# Altium PCB PCB1.PcbDoc
Units mm, origin at the board's own origin, x right, y up, seen from the top; angles counter-clockwise.
Board outline 40 x 45.42 mm, 2 copper layers (Top Layer, Bottom Layer); 17 components, 15 nets, 79 pads, 9 vias.
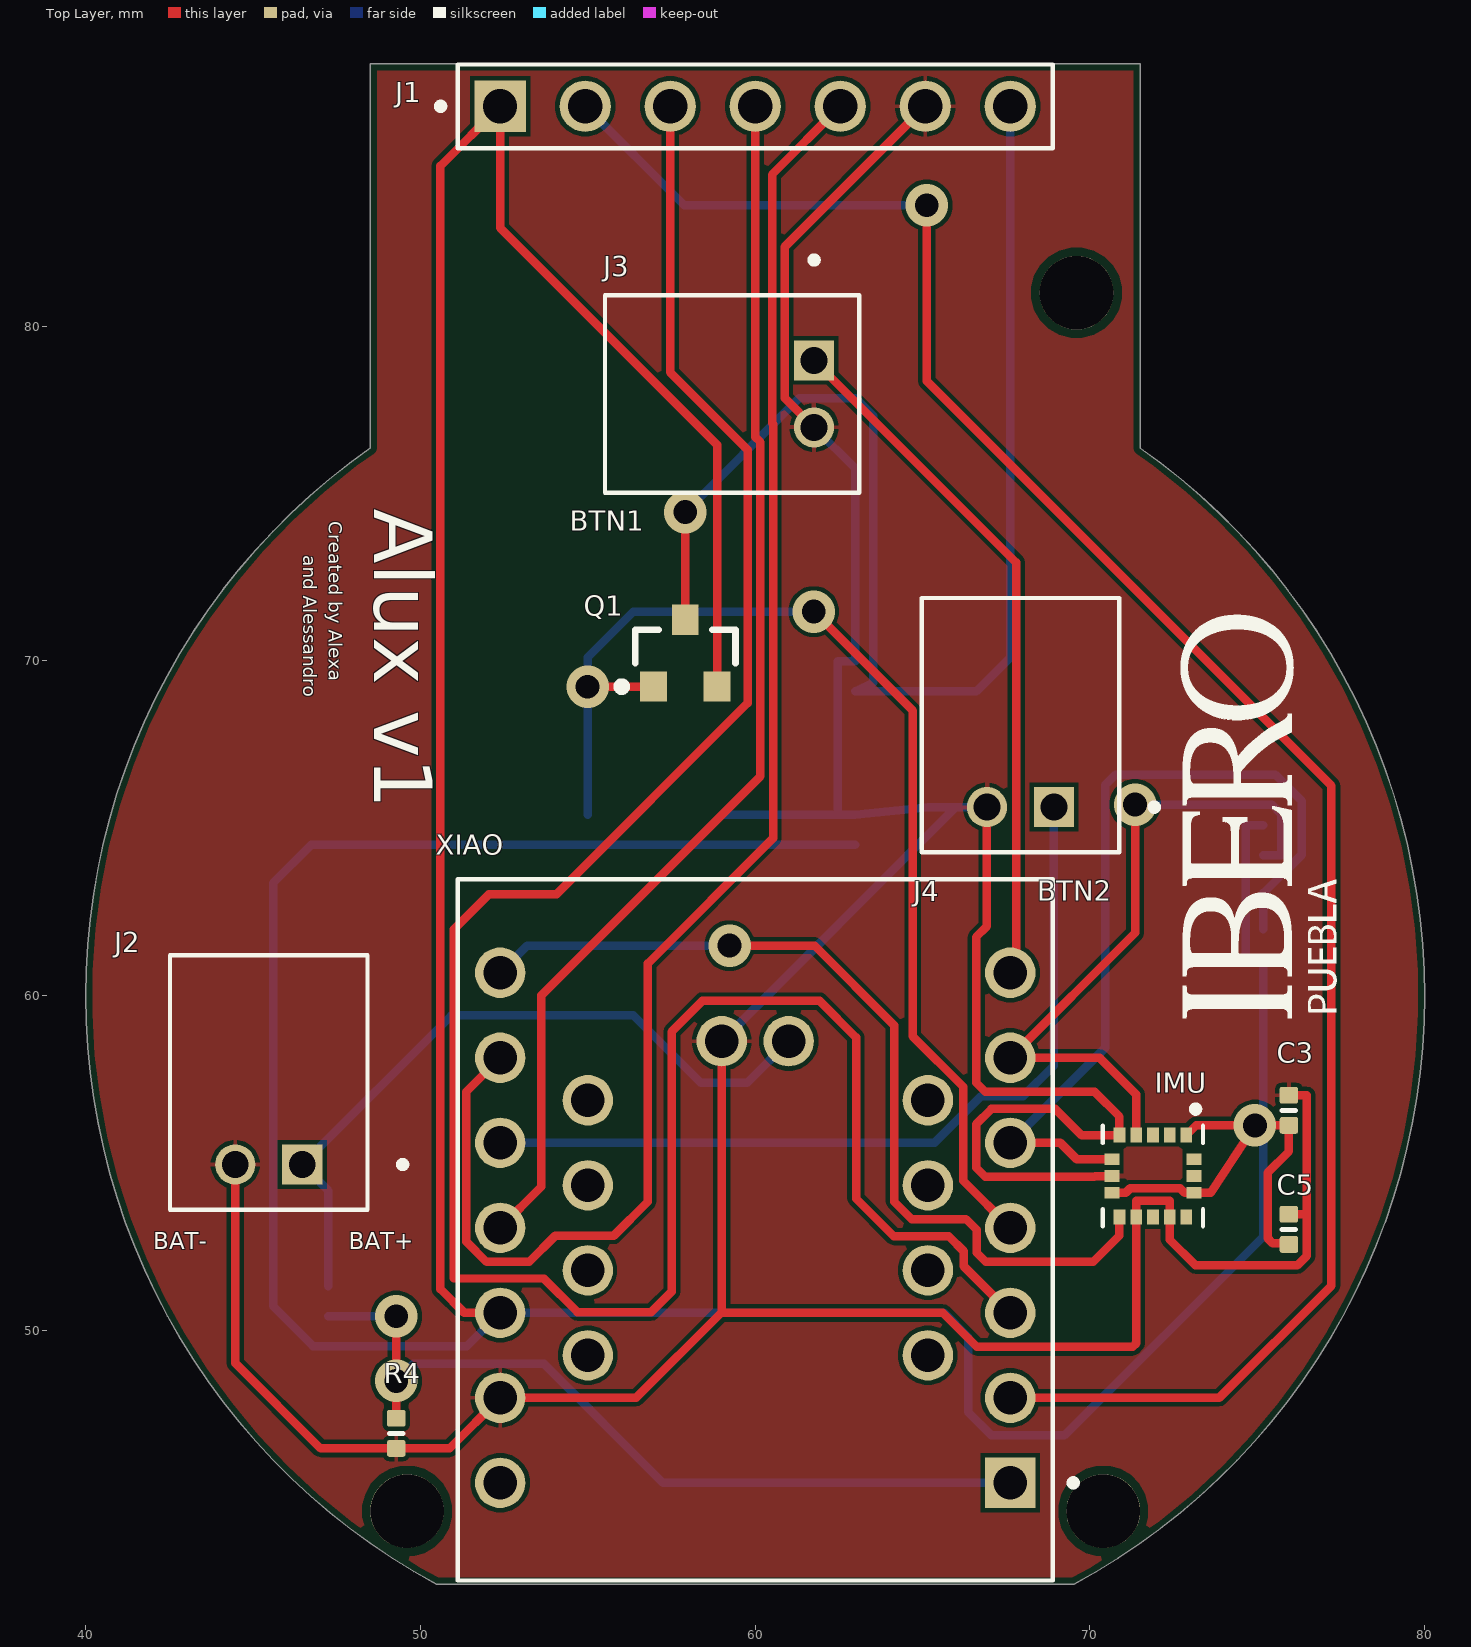
[diagram p0: Top Layer view]
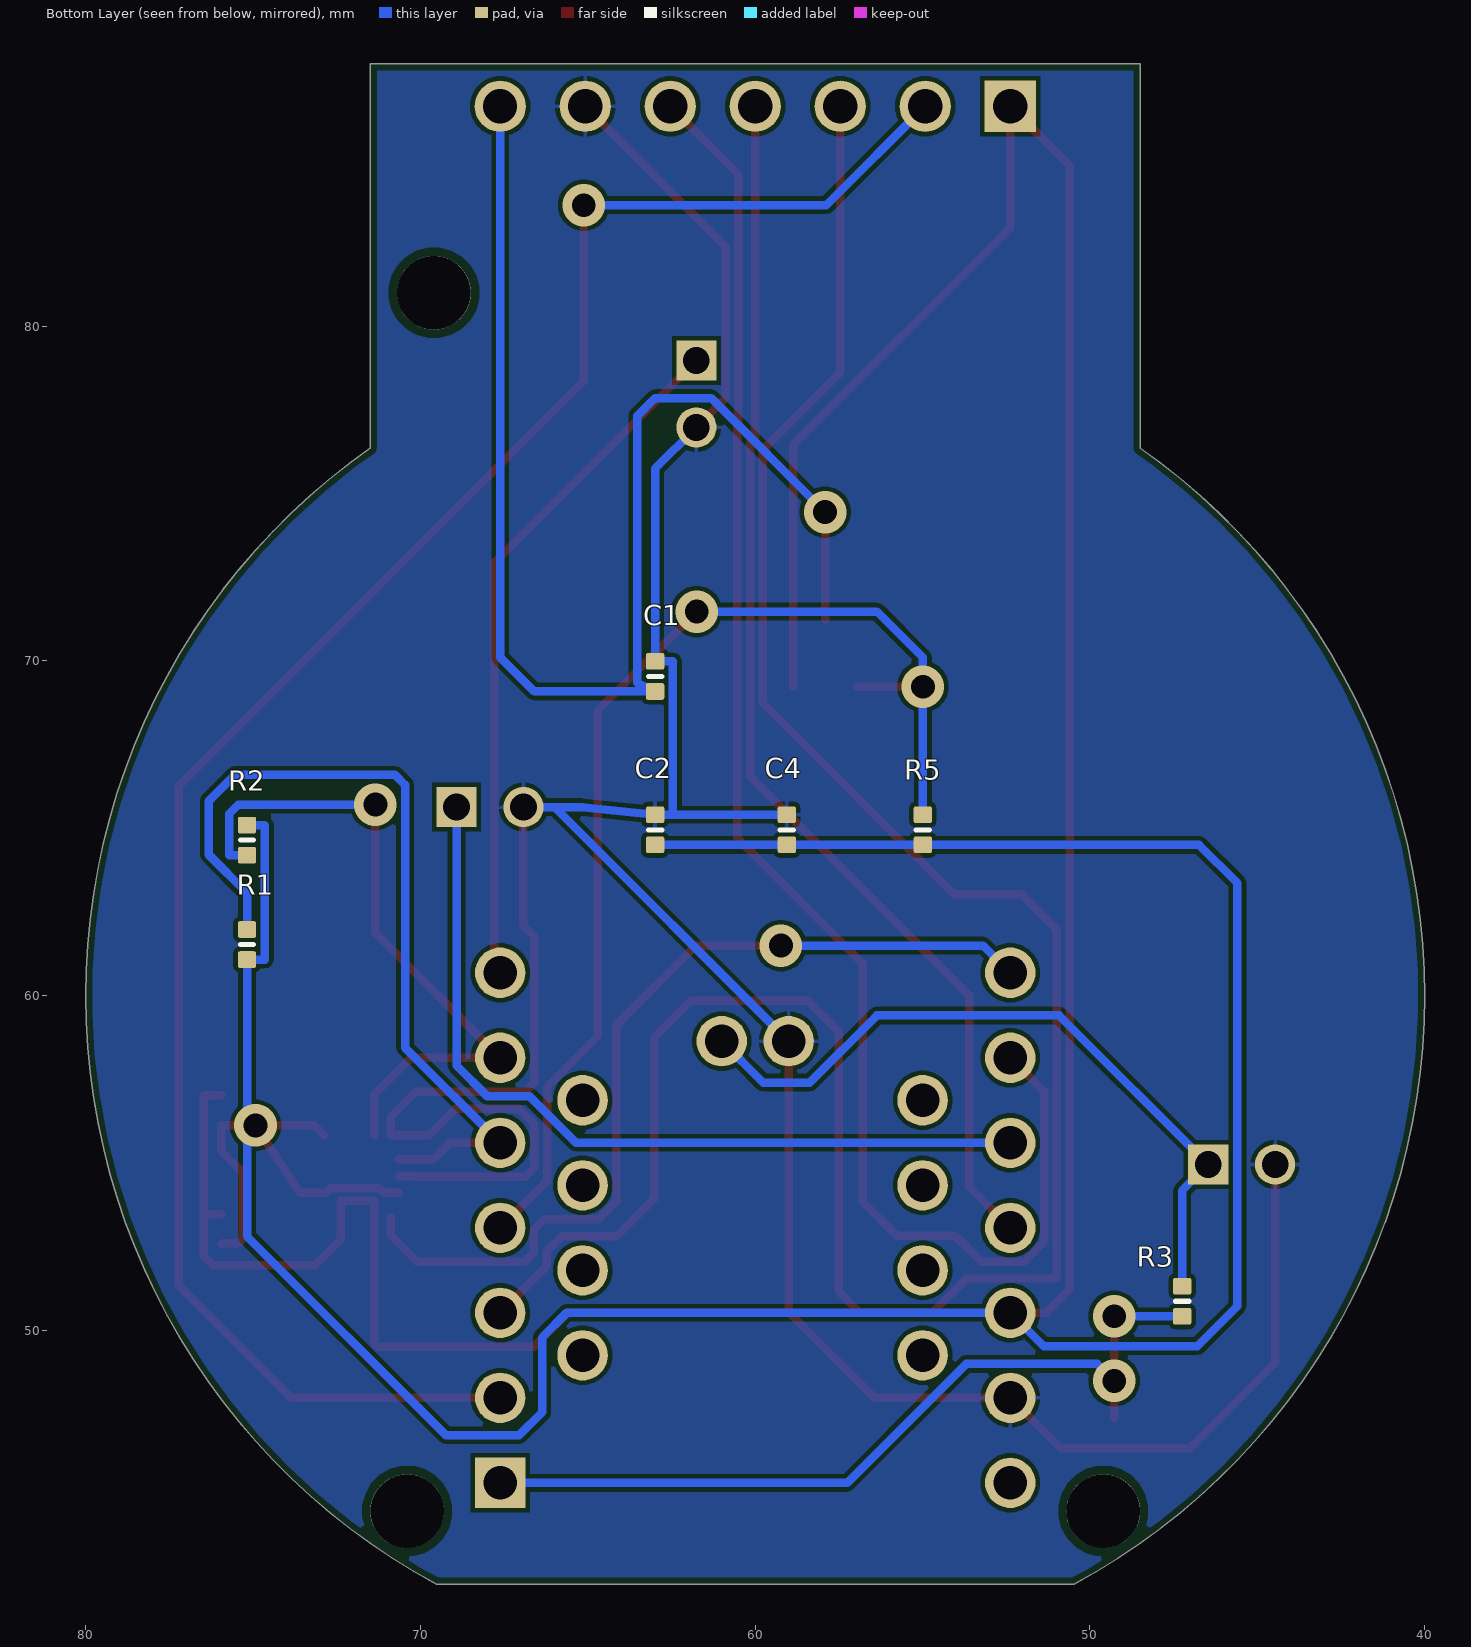
[diagram p1: Bottom Layer view, seen from below]
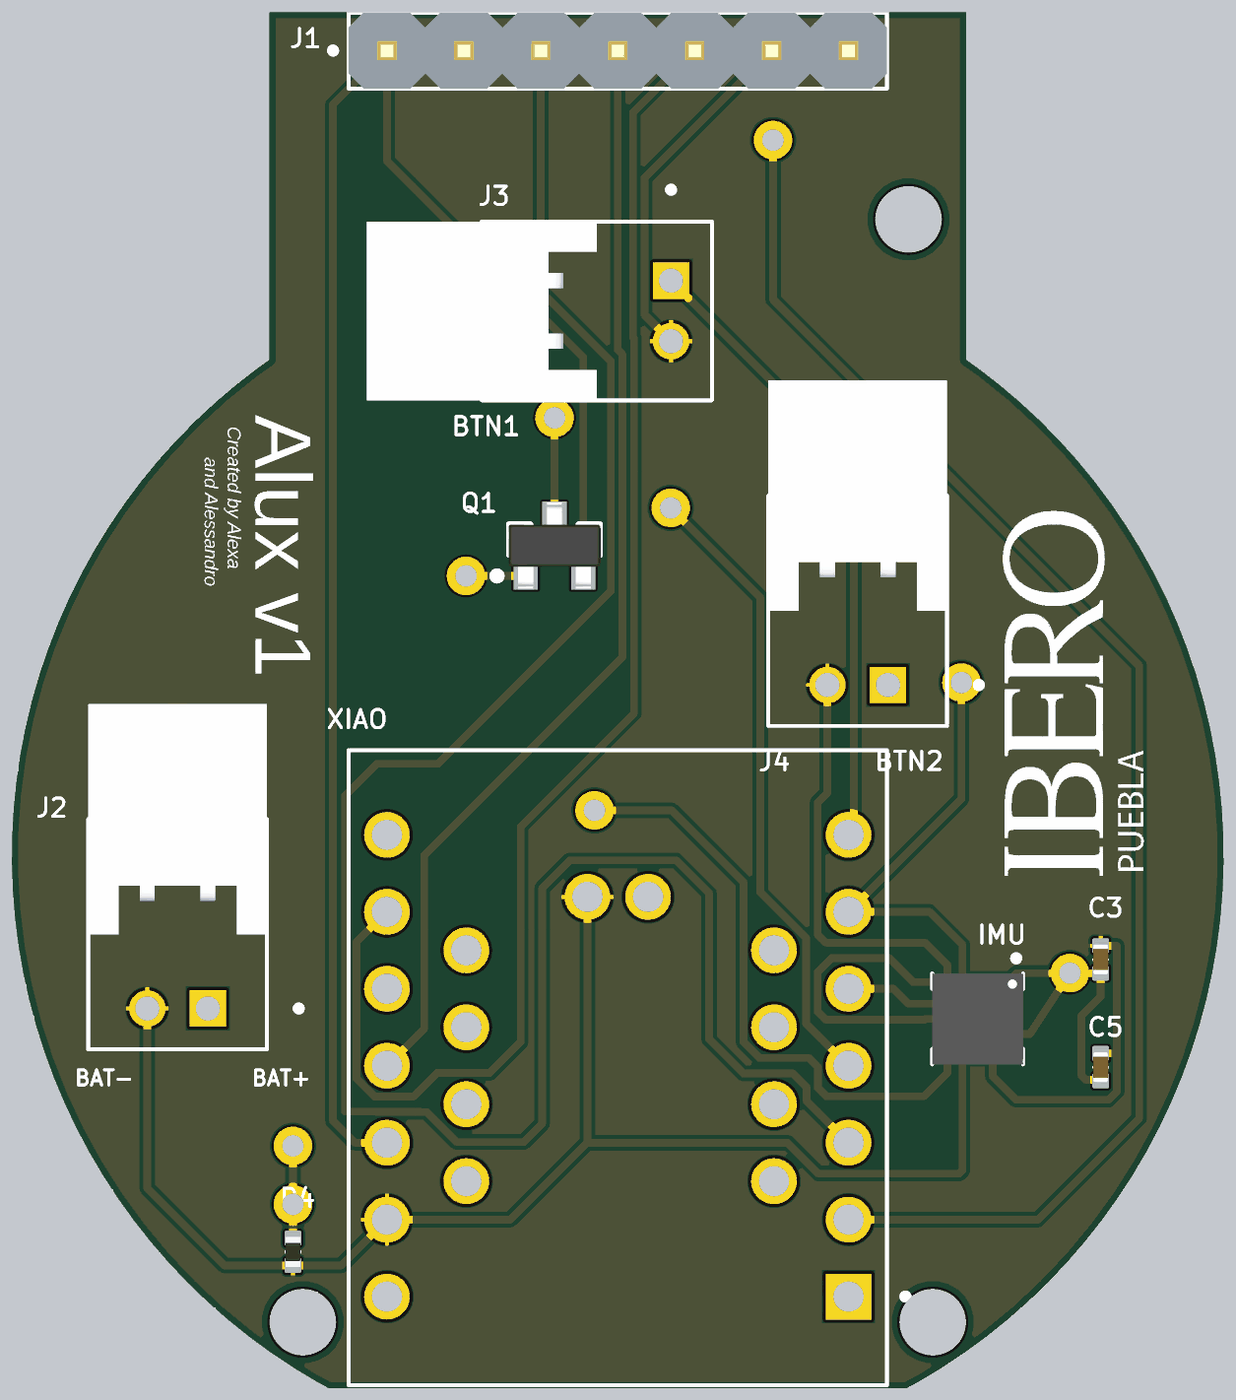
[diagram p2: 3D render of the assembled board from above, using the file's embedded part models]
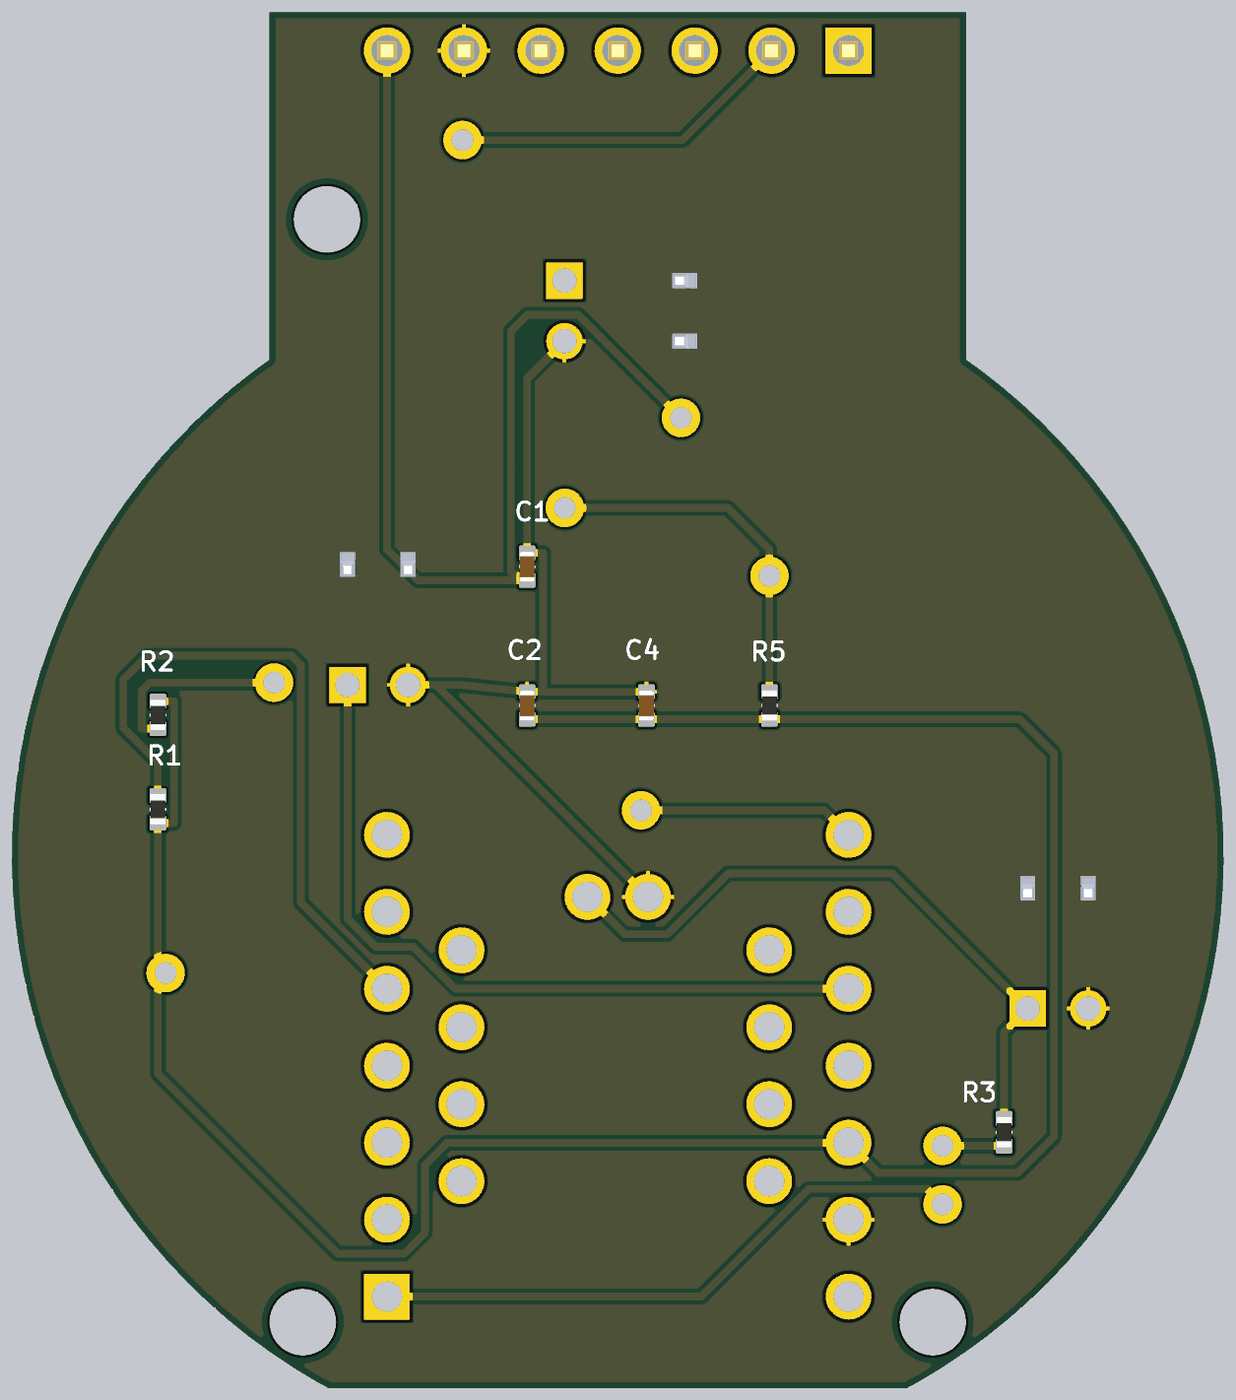
[diagram p3: 3D render of the assembled board from below, using the file's embedded part models]

## Layer stack, top to bottom
Top Solder: solder mask 0.0102, Solder Resist, Dk 3.5
Top Layer: signal copper 0.0356
Dielectric 1: dielectric 0.32, FR-4, Dk 4.8
Bottom Layer: signal copper 0.0356
Bottom Solder: solder mask 0.0102, Solder Resist, Dk 3.5

## Board outline
50.472,42.415 cw(c60,60) 48.499,76.362 48.5,76.36 48.5,87.84 71.5,87.84 71.5,76.36 71.501,76.362 cw(c60,60) 69.528,42.415

## Design rules (kind name [scope] priority, off if disabled: settings)
BoardOutlineClearance [All] p1: gap=0.2 ignorepadtopadclearanceinfootprint=FALSE
Clearance [All] p1: gap=0.127 ignorepadtopadclearanceinfootprint=FALSE except(0.25: Arc-Hole Track-Hole SMDPad-Hole THPad-Hole Via-Hole Fill-Hole Poly-Hole Region-Hole Text-Hole)
ComponentClearance [All] p1: gap=0.127 collisioncheckmode=3 verticalgap=0.127 showdistances=TRUE
DiffPairsRouting [All] p1: maxlimit=0.254 minlimit=0.127 mostfreqgap=0.127 toplayer_minwidth=0.127 toplayer_maxwidth=25.4 toplayer_prefwidth=0.127 bottomlayer_minwidth=0.127 bottomlayer_maxwidth=25.4 bottomlayer_prefwidth=0.127 maxuncoupledlength=12.7
Height [All] p1: minheight=0 maxheight=1816.048 prefheight=12.7
HoleSize [All] p1: absolutevalues=TRUE maxlimit=6.3 minlimit=0.3 maxpercent=80.000 minpercent=20.000
HoleToHoleClearance [All] p1: gap=0.25 allowstackedmicrovias=FALSE
MinimumAnnularRing [All] p1: minimumring=0.076
MinimumSolderMaskSliver [All] p1: minsoldermaskwidth=0
PlaneClearance [All] p1: clearance=0.127
PlaneConnect PlaneConnectPowerPads [InPadClass('PowerPads')] p1: planeconnectstyle=Direct reliefexpansion=0.508 reliefentries=4 reliefconductorwidth=0.254 reliefairgap=0.254
PlaneConnect [All] p2: pad.planeconnectstyle=Relief pad.reliefexpansion=0.3 pad.reliefentries=4 pad.reliefconductorwidth=0.127 pad.reliefairgap=0.127 via.planeconnectstyle=Direct via.reliefexpansion=0.3 via.reliefentries=4 via.reliefconductorwidth=0.127 via.reliefairgap=0.127
PolygonConnect PolygonConnectPowerPads [All vs (InPadClass('PowerPads'))] p1: connectstyle=Direct reliefconductorwidth=0.254 reliefentries=4 polygonreliefangle="90 Angle" airgapwidth=0.254
PolygonConnect [All] p2: thpad.connectstyle=Relief thpad.reliefconductorwidth=0.127 thpad.reliefentries=4 thpad.polygonreliefangle="90 Angle" thpad.airgapwidth=0.127 smdpad.connectstyle=Relief smdpad.reliefconductorwidth=0.127 smdpad.reliefentries=4 smdpad.polygonreliefangle="90 Angle" smdpad.airgapwidth=0.127 via.connectstyle=Direct via.reliefconductorwidth=0.127 via.reliefentries=4 via.polygonreliefangle="90 Angle" via.airgapwidth=0.127
RoutingVias [All] p1: holewidth=0.3 width=0.6 viastyle="Through Hole" minholewidth=0.3 minwidth=0.6 maxholewidth=0.6 maxwidth=6.6
SilkToSilkClearance [All] p1: silktosilkclearance=0
SilkToSolderMaskClearance [IsPad] p1: minsilkscreentomaskgap=0.127 clearancetoexposedcopper=TRUE
SolderMaskExpansion [All] p1: expansion=0.075 istentingtop=FALSE
SupplyNets "Schematic Supply Nets_1" [InNet('+3V3')] p1: voltage=0.000
SupplyNets "Schematic Supply Nets" [InNet('GND')] p2: voltage=0.000
Width [All] p1: maxlimit=25.4 minlimit=0.127 preferedwidth=0.127 minimp=50.000000 maximp=50.000000 favimp=50.000000
20 further rules are at their usual default settings.

## Classes and differential pairs
component class Sheet1: C1 C2 C3 C5 IMU J1 J2 J3 J4 Q1 R1 R2 R3 R4 R5 XIAO

## Components (designator, comment, footprint, x,y, rotation, side; value= is the part's Value field where it differs from the comment)
C1 "Capacitor 470pF +/-20% 50V 0402" CAPC0402(1005)60_L 62.992,69.538 r90 bottom value=100n
C2 "Capacitor 470pF +/-20% 50V 0402" CAPC0402(1005)60_L 62.992,64.955 r90 bottom value=100n
C3 "Capacitor 470pF +/-20% 50V 0402" CAPC0402(1005)60_L 75.946,56.573 r90 top value=100n
C4 "Capacitor 470pF +/-20% 50V 0402" CAPC0402(1005)60_L 59.055,64.955 r90 bottom value=10u
C5 "Capacitor 470pF +/-20% 50V 0402" CAPC0402(1005)60_L 75.946,53.017 r90 top value=100n
IMU "LIS3DHTR" XDCR_LIS3DHTR 71.882,54.61 r270 top (schematic designator U2)
J1 "DS1021-1X7SF162-B" CONNFLY_DS1021-1X7SF162-B 60,86.57 r0 top
J2 "S2B-XH-A(LF)(SN)" JST_S2B-PH-K-S(LF)(SN) 45.466,57.404 r180 top
J3 "S2B-XH-A(LF)(SN)" JST_S2B-PH-K-S(LF)(SN) 59.309,77.978 r270 top
J4 "S2B-XH-A(LF)(SN)" JST_S2B-PH-K-S(LF)(SN) 67.923,68.081 r180 top
Q1 "BSS84LT1G" ONSC-SOT-23-3-318-08_V 57.912,70.231 r90 top
R1 "Resistor 953K +/-1 % 0402 63 mW" RESC0402(1005)_L 75.184,61.526 r90 bottom value=4k7
R2 "Resistor 953K +/-1 % 0402 63 mW" RESC0402(1005)_L 75.184,64.643 r270 bottom value=4k7
R3 "Resistor 953K +/-1 % 0402 63 mW" RESC0402(1005)_L 47.244,50.869 r270 bottom value=100k
R4 "Resistor 953K +/-1 % 0402 63 mW" RESC0402(1005)_L 49.276,46.921 r270 top value=100k
R5 "Resistor 953K +/-1 % 0402 63 mW" RESC0402(1005)_L 54.991,64.955 r90 bottom value=100k
XIAO "XIAO_RP2350" MODULE_XIAO_RP2350 60,53 r180 top (schematic designator U1)

## Footprints (in the part's own frame and the unit in brackets; to place one, negate y for a bottom-side part, rotate by r counter-clockwise, add the part's x,y. Pads: shape width x height; smd on the part's side, far side on the other; paste and mask are expansions set on the pad)
CAPC0402(1005)60_L [mm] "Chip Capacitor, Body 1.0x0.5mm, Height 0.6mm, IPC High Density"
  rrect25% 0.5x0.55 smd: 1(-0.45,0) 2(0.45,0)
  silkscreen extent 0,-0.2 0,0.2, body extent -0.5,-0.25 0.5,0.25, height 0.6
CONNFLY_DS1021-1X7SF162-B [mm]
  rect 1.53x1.53 / inner round 1.53 / far side rect 1.53x1.53 hole 1.02 mask+0.102: 1(-7.62,0)
  round 1.53 hole 1.02 mask+0.102: 2(-5.08,0) 3(-2.54,0) 4(0,0) 5(2.54,0) 6(5.08,0) 7(7.62,0)
  silkscreen extent -9.5,-1.25 8.89,1.25, body extent -8.89,-1.25 8.89,1.25, height 9
JST_S2B-PH-K-S(LF)(SN) [mm]
  rect 1.2x1.2 / inner round 1.2 / far side rect 1.2x1.2 hole 0.8 mask+0.102: 1(-1,2.45)
  round 1.2 hole 0.8 mask+0.102: 2(1,2.45)
  silkscreen extent -4.1,-3.8 2.95,3.8, body extent -2.95,-7.6 2.95,0, height 4.8
MODULE_XIAO_RP2350 [mm]
  round 1.508 hole 1 mask+0.102: 3V3(7.62,2.477) BAT_N(1,-5.638) BAT_P(-1,-5.638) D1(-7.62,5.017) D2(-7.62,2.477) D3(-7.62,-0.063) D4(-7.62,-2.603) D5(-7.62,-5.143) D6(-7.62,-7.683) D7(7.62,-7.683) D8(7.62,-5.143) D9(7.62,-2.603) D10(7.62,-0.063) D11(5.001,3.747) D12(5.001,1.207) D13(5.001,-1.333) D14(5.001,-3.873) D15(-5.159,-3.873) D16(-5.159,-1.333) D17(-5.159,1.207) D18(-5.159,3.747) GND(7.62,5.017) VUSB(7.62,7.557)
  rect 1.508x1.508 / inner round 1.508 / far side rect 1.508x1.508 hole 1 mask+0.102: D0(-7.62,7.557)
  silkscreen extent -9.6,-10.48 8.89,10.48
ONSC-SOT-23-3-318-08_V [mm] "SOT23, 3-Leads, Body 3.04x1.4mm, Pitch 0.95mm"
  rect 0.9x0.8 smd: 1(-1,0.95) 2(-1,-0.95) 3(1,0)
  silkscreen extent -1.12,-1.5 0.7,2.02, body extent -1.42,-1.52 1.42,1.52, height 1.11
RESC0402(1005)_L [mm] "Chip Resistor, Body 1.0x0.5mm, IPC High Density"
  rrect25% 0.5x0.55 smd: 1(-0.45,0) 2(0.45,0)
  silkscreen extent 0,-0.2 0,0.2, body extent -0.5,-0.25 0.5,0.25, height 0.3
XDCR_LIS3DHTR [mm]
  rect 0.45x0.35 smd paste-1 mask+0: 1(-1.225,1) 2(-1.225,0.5) 3(-1.225,0) 4(-1.225,-0.5) 5(-1.225,-1) 9(1.225,-1) 10(1.225,-0.5) 11(1.225,0) 12(1.225,0.5) 13(1.225,1)
  rect 0.35x0.45 smd paste-1 mask+0: 6(-0.5,-1.225) 7(0,-1.225) 8(0.5,-1.225) 14(0.5,1.225) 15(0,1.225) 16(-0.5,1.225)
  silkscreen extent -2.1,-1.5 1.5,1.5, body extent -1.5,-1.5 1.5,1.5, height 1

## Part data
C1 C2 C3 C4 C5: library part CMP-001-00068-4, "Chip Capacitor, 470pF +/-20%, 50V, 0402, Thickness 0.6 mm", Case/Package=0402, Max Operating Temperature=85°C, Min Operating Temperature=-55°C, Tolerance=20%, Voltage Rating=50V, Mounting Technology=SMT, Pins=2
IMU: "Accelerometer X, Y, Z Axis Â±2g, 4g, 8g, 16g 0.5Hz ~ 625Hz 16-LGA (3x3)", Package="LGA-16 STMicroelectronics", Check_prices=https://www.snapeda.com/parts/LIS3DHTR/STMicroelectronics/view-part/278195/?ref=eda, Digi-Key_Part_Number=497-10613-1-ND, MF=STMicroelectronics, MP=LIS3DHTR, SnapEDA_Link=https://www.snapeda.com/parts/LIS3DHTR/STMicroelectronics/view-part/278195/?ref=snap
J1: "Pin header; pin strips; male; PIN: 7; straight; 2.54mm; THT; 1x7", Package=None, Check_prices=https://www.snapeda.com/parts/DS1021-1X7SF162-B/Connfly/view-part/?ref=eda, MF=Connfly, MP=DS1021-1X7SF162-B, SnapEDA_Link=https://www.snapeda.com/parts/DS1021-1X7SF162-B/Connfly/view-part/?ref=snap
J2 J3 J4: library part S2B-PH-K-S(LF)(SN), "Connector Header Through Hole, Right Angle 2 position", Package="NON STANDARD-2 J.S.T.", Check_prices=https://www.snapeda.com/parts/S2B-PH-K-S(LF)(SN)/JST/view-part/?ref=eda, MF="JST Sales America Inc.", MP=S2B-PH-K-S(LF)(SN), SnapEDA_Link=https://www.snapeda.com/parts/S2B-PH-K-S(LF)(SN)/JST/view-part/?ref=snap
Q1: library part CMP-013-00012-4, "Power MOSFET Single P-Channel, -50 V, 10 Ohm, 3-Pin SOT-23, Pb-Free, Tape and Reel", Case/Package=SOT-23-3, Input Capacitance=30pF, Manufacturer="ON Semiconductor", Max Operating Temperature=150°C, Min Operating Temperature=-55°C, Nominal Dual Supply Voltage=5V, Package Description="3-Pin Small Outline Transistor, Body 2.9 x 1.3 mm, Pitch 0.95 mm", Package Quantity=3000, Package Reference="SOT-23 (318-08)", Power=225mW, Datasheet URL=http://www.onsemi.com/pub_link/Collateral/BSS84LT1-D.PDF, Datasheet Version="Rev. 9, 10/2016", Elements=1, Mounting Technology=SM, Nominal Vgs=-10V, Packaging=TapeandReel, Pins=3, Rds On Max=10Ohm, RoHS Compliant=True, Typical Rise Time=1ns
R1 R2 R3 R4 R5: library part CMP-009-00125-3, "Chip Resistor, 953 kOhms, +/-1 %, 63 mW, -55 to 155 degC, 0402", Case/Package=0402, Max Operating Temperature=155°C, Min Operating Temperature=-55°C, Power=63mW, Tolerance=1%, Pins=2
XIAO: "RP2350 Seeeduino XIAO - ARM Cortex-M33 MCU 32-Bit Embedded Evaluation Board", Package=None, Check_prices=https://www.snapeda.com/parts/XIAO%20RP2350/Seeed+Studio/view-part/?ref=eda, MF="Seeed Studio", MP="XIAO RP2350", SnapEDA_Link=https://www.snapeda.com/parts/XIAO%20RP2350/Seeed+Studio/view-part/?ref=snap

## Free pads (board coordinates)
  round 2.2 hole 2.2 unplated: 7(69.6,81) 8(70.4,44.6) 9(49.6,44.6)

## Via types
v1: diameter 1.27, hole 0.711, Top Layer to Bottom Layer, 9 vias

## Nets (pads, with @x,y where several pads share a name; then routed paths per layer and width w, separated by ;. In a path a pad name is that pad's centre, name@x,y a point inside that pad or via, vN(x,y) a via of type N, cw(c..) or ccw(c..) an arc to the next point about the centre after c; other vN are vias at no path point)
+3V3: C2.1 C3.1 C4.1 C5.1 IMU.1 IMU.8 IMU.14 J1.1 Q1.2 R1.1 R2.1 R5.1 XIAO.3V3 | length 151.2
  Top Layer w0.254: XIAO.3V3 51.308,50.523 50.597,51.235 50.597,84.787 J1.1 52.38,82.938 58.862,76.456 Q1.2 ; IMU.8 71.072,54.11 71.207,54.245 72.692,54.245 72.827,54.11 IMU.14 73.609,54.11 v1(74.93,56.123) ; IMU.1 73.17,56.123 v1(74.93,56.123) ; C5.1 75.913,52.6 75.46,52.6 75.311,52.749 75.311,54.712 75.946,55.347 C3.1 v1(74.93,56.123)
  Bottom Layer w0.254: C2.1 C4.1 R5.1 46.736,64.505 45.593,63.362 45.593,50.724 46.787,49.53 51.386,49.53 XIAO.3V3 65.631,50.523 66.37,49.784 66.37,47.549 67.056,46.863 69.24,46.863 75.184,52.807 v1@75.184,56.377 ; v1(74.93,56.123) v1@75.184,56.377 ; R2.1 74.651,65.093 74.651,61.076 R1.1 v1@75.184,56.377
BAT_P: J2.1 R3.1 XIAO.BAT_P | length 21.7
  Bottom Layer w0.254: R3.1 47.244,54.176 J2.1 50.923,59.411 56.363,59.411 58.369,57.404 59.766,57.404 XIAO.BAT_P
BTN1: J3.1 XIAO.D6 | length 21
  Top Layer w0.254: J3.1 67.793,72.944 67.793,60.683 XIAO.D6
BTN2: J4.1 XIAO.D9 | length 25.2
  Bottom Layer w0.254: XIAO.D9 65.357,55.603 66.746,56.993 68.004,56.993 68.923,57.912 J4.1
DISP_CS: J1.2 XIAO.D1 | length 59.7
  Top Layer w0.254: v1(65.126,83.617) 65.126,78.359 77.216,66.269 77.216,51.333 73.866,47.983 XIAO.D1
  Bottom Layer w0.254: J1.2 57.873,83.617 v1(65.126,83.617)
DISP_DC: J1.3 XIAO.D2 | length 73.2
  Top Layer w0.254: J1.3 57.46,78.62 59.772,76.308 59.772,68.738 54.064,63.031 52.046,63.031 50.991,61.976 50.991,51.555 53.696,51.537 54.686,50.546 56.896,50.546 57.506,51.156 57.506,58.928 58.419,59.842 61.926,59.842 63.015,58.752 63.015,53.937 64.145,52.807 65.786,52.807 66.231,52.362 66.231,51.913 XIAO.D2
DISP_PWR: Q1.1 R5.2 XIAO.D3 | length 34.8
  Top Layer w0.254: v1(54.991,69.231) Q1.1 ; v1(61.747,71.476) 64.709,68.514 64.709,58.782 66.218,57.273 66.218,54.466 XIAO.D3
  Bottom Layer w0.254: R5.2 v1(54.991,69.231) 54.991,70.104 56.363,71.476 v1(61.747,71.476)
GND: C1.2 C2.2 C3.2 C4.2 C5.2 IMU.5 IMU.7 IMU.10 IMU.12 J1.6 J2.2 J3.2 J4.2 R4.2 XIAO.BAT_N XIAO.GND | length 127
  Top Layer w0.254: J2.2 44.466,49.02 47.015,46.471 R4.2 50.868,46.471 XIAO.GND 56.442,47.983 58.979,50.521 ; XIAO.BAT_N 59,50.542 58.979,50.521 ; J3.2 60.884,77.853 60.884,82.374 J1.6 ; J4.2 66.923,62.072 66.599,61.747 66.599,57.404 66.878,57.125 70.145,57.125 70.882,56.388 IMU.5 70.882,55.829 69.751,55.829 68.964,56.617 67.056,56.617 66.599,56.159 66.599,54.864 66.878,54.585 70.129,54.585 70.155,54.61 IMU.7 ; C5.2 76.479,53.467 ; C3.2 76.479,57.023 76.479,53.467 ; 58.979,50.521 65.608,50.521 66.624,49.505 71.272,49.505 71.382,49.614 IMU.10 71.382,53.864 72.382,53.864 IMU.12 72.382,52.713 73.152,51.943 76.2,51.943 76.479,52.222 76.479,53.467
  Bottom Layer w0.254: XIAO.BAT_N 65.993,65.632 ; C4.2 62.459,65.405 ; J3.2 62.992,75.745 C1.2 62.459,69.988 62.459,65.405 ; J4.2 65.993,65.632 ; 62.459,65.405 C2.2 65.174,65.632 65.993,65.632
I2C_SCL: IMU.4 R2.2 XIAO.D5 | length 20.8
  Top Layer w0.254: v1(71.349,65.71) 71.349,61.872 XIAO.D5 70.287,58.143 71.382,57.048 IMU.4
  Bottom Layer w0.254: v1(71.349,65.71) 75.438,65.71 75.717,65.43 75.717,64.193 R2.2
I2C_SDA: IMU.6 R1.2 XIAO.D4 | length 25.7
  Top Layer w0.254: XIAO.D4 69.113,55.603 69.607,55.11 IMU.6
  Bottom Layer w0.254: XIAO.D4 70.46,58.443 70.46,66.294 70.764,66.599 75.54,66.599 76.327,65.811 76.327,64.211 75.184,63.068 R1.2
LIS_INT2: IMU.9 XIAO.D7 | length 27.1
  Top Layer w0.254: v1(59.233,61.493) 61.773,61.493 64.151,59.115 64.151,53.848 64.674,53.325 66.294,53.325 66.612,53.008 66.612,52.324 66.88,52.055 70.105,52.055 70.882,52.832 IMU.9
  Bottom Layer w0.254: XIAO.D7 53.19,61.493 v1(59.233,61.493)
SPI_MOSI: J1.4 XIAO.D10 | length 36.8
  Top Layer w0.254: XIAO.D10 53.61,54.294 53.61,60.011 60.153,66.554 60.153,76.536 60,76.689 J1.4
SPI_SCK: J1.5 XIAO.D8 | length 47.5
  Top Layer w0.254: XIAO.D8 51.372,57.135 51.372,52.646 51.973,52.045 53.243,52.045 54.026,52.827 55.773,52.827 56.794,53.848 56.794,60.96 60.534,64.7 60.534,77.07 60.503,77.102 60.503,84.533 J1.5
VBAT_DIV: R3.2 R4.1 XIAO.D0 | length 25.1
  Top Layer w0.254: R4.1 v1(49.276,48.489) v1(49.276,50.419)
  Bottom Layer w0.254: R3.2 v1(49.276,50.419) ; v1(49.276,48.489) 49.784,48.997 53.696,48.997 57.249,45.443 XIAO.D0
VCC_DISP: C1.1 J1.7 Q1.3 | length 40.5
  Top Layer w0.254: Q1.3 v1(57.912,74.447)
  Bottom Layer w0.254: v1(57.912,74.447) 61.316,77.851 62.992,77.851 63.525,77.318 63.525,69.342 C1.1 66.604,69.088 67.62,70.104 J1.7
pads on no net: IMU.2 IMU.3 IMU.11 IMU.13 IMU.15 IMU.16 XIAO.D11 XIAO.D12 XIAO.D13 XIAO.D14 XIAO.D15 XIAO.D16 XIAO.D17 XIAO.D18 XIAO.VUSB

## Polygon pours and split planes (outlines as drawn)
GND on Top Layer "GND_L01_P003" (solid, remove dead copper, pour order 3): 25.527,92.71 25.654,92.583 92.075,92.583 92.075,34.036 25.146,34.036
GND on Bottom Layer "GND_L02_P006" (solid, remove dead copper, pour order 6): 13.081,98.806 16.891,94.996 93.345,94.996 93.345,35.433 91.948,36.83 7.493,36.83

## Silkscreen, mask and mechanical layers (free items; w line width, h text height)
Top Overlay:
  drawing of 11 lines, arcs and shapes, not listed
  text "Alux v1" at 48.037,74.549 h3 r270
  text "Created by Alexa" at 47.122,74.168 h0.7 r270
  text "BTN1" at 54.456,73.887 h0.6
  text "and Alessandro" at 46.362,73.152 h0.7 r270
  text "BTN2" at 68.426,62.838 h0.6
  text "BAT-" at 42.01,52.424 h0.5
  text "BAT+" at 47.852,52.424 h0.5
Mechanical 1:
  lines w0.254: 48.499,76.362 ccw(c60,60) 50.472,42.415 69.528,42.415 ccw(c60,60) 71.501,76.362 ; 48.5,76.36 48.5,87.84 71.5,87.84 71.5,76.36